# Altium PCB PCB_14layers_1mm73.PcbDoc (part 3 of 4)
Units mm, origin at the board's own origin, x right, y up, seen from the top; angles counter-clockwise.
Board outline 66 x 50 mm, 14 copper layers (Top Layer, Int1 (GND), Int2 (PWR), Int3 (Sign), GND, Int4 (Sign), Int5 (GND), Int6 (PWR), Int7 (Sign), GND2, Int8 (Sign), Int9 (PWR), Int10 (GND), Bottom Layer), stack 1.644 mm thick; 436 components, 541 nets, 2990 pads, 78 vias.
Unrouted connection lines stored in the file: 1647.
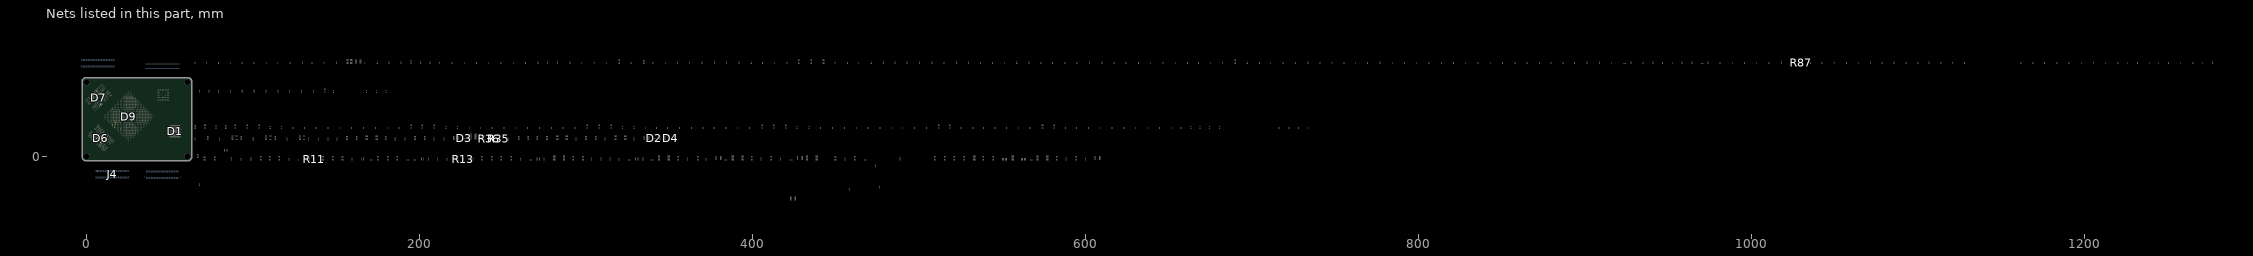
[diagram p14: the nets of this part, all layers, seen from the top]

## Part data (continued)
D5: "High Efficiency, 1MHz, 3A, 5.5V Input Synchronous Step Down Regulator", Manufacturer=Silergy, Package=SOT-23(6), Temperature=-40...+125°C, ComponentLink1Description=Link, ComponentLink2Description=LocalLink, ComponentLink2URL=C:\Users\Public\Documents\Altium\datasheet\ICs_PWR\SY8089AAC.pdf, PartNumber=SY8089AAC, Type="Step Down"
D6 D7: "LPDDR4 TFBGA-200", Manufacturer=Micron, Package=TFBGA-200, Temperature=-40...+105°C, ComponentLink1Description=Link, ComponentLink1URL=https://www.farnell.com/datasheets/3681594.pdf, ComponentLink2Description=LocalLink, ComponentLink2URL=C:\Users\Public\Documents\Altium\Datasheet\ICs\BIWINIndustrialLPDDR4X4266DatasheetV3.0_BWMZCX32H2A-64GI-X.pdf, PartNumber="MT53E2G32D4DE-046 AAT:A", Type=LPDDR4
D8: "eMMC", Manufacturer="Samsung Semiconductor", Package=153-FBGA, Temperature=-40...+125°C, ComponentLink1Description=Link, ComponentLink1URL=https://www.lcsc.com/datasheet/lcsc_datasheet_2410121848_Samsung-KLM8G1GETF-B041_C499918.pdf, ComponentLink2Description=LocalLink, ComponentLink2URL=C:\Users\Public\Documents\Altium\Datasheet\ICs\2410121848_Samsung-KLM8G1GETF-B041_C499918.pdf, PartNumber=KLM8G1GETF-B041, Type=eMMC
D9: "A high perfomance, low power AIoT processor", Manufacturer=Rockchip, Package=FCBGA1088L, Temperature=-40...+125°C, ComponentLink1Description="New link", ComponentLink1URL=C:\Users\Public\Documents\Altium\Datasheet\ICs\Rockchip_RK3588_Datasheet_V1.3-20220328.pdf, PartNumber=RK3588M, Type=Processor
D10: "Automotive Single-Pole Double-Throw Analog Switch", Manufacturer="Texas Instruments", Package="SOT-23 (6)", Temperature=-40...+125°C, ComponentLink1Description=Link, ComponentLink1URL=https://www.ti.com/lit/ds/symlink/sn74lvc1g3157-q1.pdf?ts=1743508565257&ref_url=https%253A%252F%252Fwww.ti.com%252Fproduct%252FSN74LVC1G3157-Q1, ComponentLink2Description=LocalLink, ComponentLink2URL=C:\Users\Public\Documents\Altium\Datasheet\ICs\sn74lvc1g3157-q1.pdf, PartNumber=1P1G3157QDBVRQ1, Type="Analog Switch"
D11: "300 mA, Low Voltage, Low Quiescent Current LDO Regulator", Manufacturer=Microchip, Package=SOT-23(5), Temperature=-40...+125°C, ComponentLink1Description=Link, ComponentLink1URL=https://ww1.microchip.com/downloads/aemDocuments/documents/APID/ProductDocuments/DataSheets/MCP1824-Data-Sheet-DS20002070.pdf, ComponentLink2Description=LocalLink, ComponentLink2URL=C:\Users\Public\Documents\Altium\Datasheet\ICs_PWR\MCP1824-Data-Sheet-DS20002070.pdf, PartNumber=MCP1824T-3302E/OT, Type=LDO
D12: "Low-Noise, Fixed Output Voltage 3.3V, 500mA LDO Regulator", Manufacturer="Shanghai Belling", Package=SOT-23(5), Temperature=-40...+125°C, ComponentLink1Description=Link, ComponentLink1URL=https://jlcpcb.com/api/file/downloadByFileSystemAccessId/8588911280069074944, ComponentLink2Description=LocalLink, ComponentLink2URL=C:\Users\Public\Documents\Altium\datasheet\ICs_PWR\C313520.pdf, PartNumber=BL8555-33PRA, Type=LDO
D13: "Low-Noise, Fixed Output Voltage 1.8V, 500mA LDO Regulator", Manufacturer=RichTech, Package=SOT-23(5), Temperature=-40...+125°C, ComponentLink1Description=Link, ComponentLink1URL=https://www.richtek.com/assets/product_file/RT9167=RT9167A/DS9167A-29.pdf, ComponentLink2Description=LocalLink, ComponentLink2URL=C:\Users\Public\Documents\Altium\datasheet\ICs_PWR\DS9167A-29.pdf, PartNumber=RT9167A-18CB, Type=LDO
J1 J2 J3 J4: "0.5mm Pitch SMT Board-to-Board Connector", Manufacturer=Hirose, Temperature=-40...+105°C, ComponentLink1Description=Link, ComponentLink2Description=LocalLink, Male/Female=F, Row=2, Type=Board-to-Board
  J1 J3 J4: ComponentLink2URL=C:\Users\Public\Documents\Altium\Datasheet\Connectors\DF12NA(3.0)-80DS-0.5V(51).pdf, PartNumber=DF12NA(3.0)-80DS-0.5V(51), Positions=80
  J2: ComponentLink1URL=https://www.hirose.com/ru/product/document?clcode=CL0684-4032-1-51&productname=DF40C-100DP-0.4V(51)&series=DF40&documenttype=2DDrawing&lang=ru&documentid=0001001212, ComponentLink2URL=C:\Users\Public\Documents\Altium\Datasheet\Connectors\DF40C-100DP-0.4V(51)_CL0684-4032-1-51_2DDrawing_0001001212.pdf, PartNumber=DF40C-100DP-0.4V(51), Positions=100
L1 L6 L7 L8 L11 L12 L14: "Power Inductor, 220nH, ±20%, 12A, SMD 3225, -40...+125°C", Manufacturer=INPAQ, MaxCurrent=12A, Package="SMD 3225", Temperature=-40...+125°C, Tolerance=±20%, ComponentLink1Description=Link, ComponentLink1URL=https://product.tdk.com/system/files/dam/doc/product/inductor/inductor/smd/catalog/inductor_commercial_power_tms322512alm_en.pdf, ComponentLink2Description=LocalLink, ComponentLink2URL=C:\Users\Public\Documents\Altium\Datasheet\Inductance\inductor_commercial_power_tms322512alm_en.pdf, DCR=0.006R, PartNumber=TMS322512ALM-R22MTAA, Type="Power Inductor"
L2 L3 L4 L5 L9 L10: "Power Inductor, 0.47uH, ±20%, 5.6A, SMD 2016, -40...+125°C", Manufacturer=INPAQ, MaxCurrent=5.6A, Package="SMD 2016", Temperature=-40...+125°C, Tolerance=±20%, ComponentLink1Description=Link, ComponentLink1URL=https://www.inpaqgp.com/product-co1.php?k=hZx4bT6%2FQ%2BNwEKUtRT9BJg%3D%3D#, ComponentLink2Description=LocalLink, ComponentLink2URL=C:\Users\Public\Documents\Altium\Datasheet\Inductance\spec_WIP201610.pdf, DCR=0.033R, PartNumber=WIP201610P-R47ML, Type="Power Inductor"
L15: "Power Inductor, 2.2uH, ±20%, 2.1A, SMD 4026, -40...+125°C", Manufacturer=Sunlord, MaxCurrent=2.1A, Package="SMD 4026", Temperature=-40...+125°C, Tolerance=±20%, ComponentLink1Description=Link, ComponentLink2Description=LocalLink, ComponentLink2URL=C:\Users\Public\Documents\Altium\Datasheet\Inductance\swpa.pdf, DCR=0.04R, PartNumber=SWPA4026S2R2MT, Type="Power Inductor"
R1 R2 R9 R10 R11 R13 R14 R15 R16 R18 R22 R23 R24: "Resistor film, 100R, ±5%, 0402, 0.0625W, -55...+155°C", Manufacturer=Yageo, Package=0402, Power=0.0625W, Temperature=-55...+155°C, Tolerance=±5%, ComponentLink1Description=Link, ComponentLink1URL=https://www.yageo.com/upload/media/product/productsearch/datasheet/rchip/PYu-RC_Group_51_RoHS_L_12.pdf, ComponentLink2Description=LocalLink, ComponentLink2URL=C:\Users\Public\Documents\Altium\Datasheet\Resistors\PYu-RC_Group_51_RoHS_L_12.pdf, PartNumber=RC0402JR-07100RL, Type="Resistor film"
R12 R79 R94 R95 R96 R97: "NC, No BOM", Package=0402, PartNumber=NC, Type="Resistor film"
R17 R46: "Resistor film, 120K, ±1%, 0402, 0.0625W, -55...+155°C", Manufacturer=Yageo, Package=0402, Power=0.0625W, Temperature=-55...+155°C, Tolerance=±1%, ComponentLink1Description=Link, ComponentLink1URL=https://www.yageo.com/upload/media/product/productsearch/datasheet/rchip/PYu-RC_Group_51_RoHS_L_12.pdf, ComponentLink2Description=LocalLink, ComponentLink2URL=C:\Users\Public\Documents\Altium\Datasheet\Resistors\PYu-RC_Group_51_RoHS_L_12.pdf, PartNumber=RC0402FR-07120KL, Type="Resistor film"
R19 R72: "Resistor film, 0R, 0402, -55...+155°C", Manufacturer=Yageo, Package=0402, Temperature=-55...+155°C, ComponentLink1Description=Link, ComponentLink1URL=https://www.yageo.com/upload/media/product/productsearch/datasheet/rchip/PYu-RC_Group_51_RoHS_L_12.pdf, ComponentLink2Description=LocalLink, ComponentLink2URL=C:\Users\Public\Documents\Altium\Datasheet\Resistors\PYu-RC_Group_51_RoHS_L_12.pdf, PartNumber=RC0402JR-070RL, Type="Resistor film"
R20: "Resistor film, 20K, ±1%, 0402, 0.0625W, -55...+155°C", Manufacturer=Yageo, Package=0402, Power=0.0625W, Temperature=-55...+155°C, Tolerance=±1%, ComponentLink1Description=Link, ComponentLink1URL=https://www.yageo.com/upload/media/product/productsearch/datasheet/rchip/PYu-RC_Group_51_RoHS_L_12.pdf, ComponentLink2Description=LocalLink, ComponentLink2URL=C:\Users\Public\Documents\Altium\Datasheet\Resistors\PYu-RC_Group_51_RoHS_L_12.pdf, PartNumber=RC0402FR-0720KL, Type="Resistor film"
R35 R37 R38 R42 R78 R85 R93: "Resistor film, 100K, ±5%, 0402, 0.0625W, -55...+155°C", Manufacturer=Yageo, Package=0402, Power=0.0625W, Temperature=-55...+155°C, Tolerance=±5%, ComponentLink1Description=Link, ComponentLink1URL=https://www.yageo.com/upload/media/product/productsearch/datasheet/rchip/PYu-RC_Group_51_RoHS_L_12.pdf, ComponentLink2Description=LocalLink, ComponentLink2URL=C:\Users\Public\Documents\Altium\Datasheet\Resistors\PYu-RC_Group_51_RoHS_L_12.pdf, PartNumber=RC0402JR-07100KL, Type="Resistor film"
R36 R80 R86: "Resistor film, 120K, ±5%, 0402, 0.0625W, -55...+155°C", Manufacturer=Yageo, Package=0402, Power=0.0625W, Temperature=-55...+155°C, Tolerance=±5%, ComponentLink1Description=Link, ComponentLink1URL=https://www.yageo.com/upload/media/product/productsearch/datasheet/rchip/PYu-RC_Group_51_RoHS_L_12.pdf, ComponentLink2Description=LocalLink, ComponentLink2URL=C:\Users\Public\Documents\Altium\Datasheet\Resistors\PYu-RC_Group_51_RoHS_L_12.pdf, PartNumber=RC0402JR-07120KL, Type="Resistor film"
R41 R50 R51 R58 R59 R68 R69 R70: "Resistor film, 10K, ±5%, 0402, 0.0625W, -55...+155°C", Manufacturer=Yageo, Package=0402, Power=0.0625W, Temperature=-55...+155°C, Tolerance=±5%, ComponentLink1Description=Link, ComponentLink1URL=https://www.yageo.com/upload/media/product/productsearch/datasheet/rchip/PYu-RC_Group_51_RoHS_L_12.pdf, ComponentLink2Description=LocalLink, ComponentLink2URL=C:\Users\Public\Documents\Altium\Datasheet\Resistors\PYu-RC_Group_51_RoHS_L_12.pdf, PartNumber=RC0402JR-0710KL, Type="Resistor film"
R45: "Resistor film, 100K, ±1%, 0402, 0.0625W, -55...+155°C", Manufacturer=Yageo, Package=0402, Power=0.0625W, Temperature=-55...+155°C, Tolerance=±1%, ComponentLink1Description=Link, ComponentLink1URL=https://www.yageo.com/upload/media/product/productsearch/datasheet/rchip/PYu-RC_Group_51_RoHS_L_12.pdf, ComponentLink2Description=LocalLink, ComponentLink2URL=C:\Users\Public\Documents\Altium\Datasheet\Resistors\PYu-RC_Group_51_RoHS_L_12.pdf, PartNumber=RC0402FR-07100KL, Type="Resistor film"
R49 R57 R73 R76 R81 R82: "Resistor film, 240R, ±1%, 0201, 0.05W, -55...+125°C", Manufacturer=Yageo, Package=0201, Power=0.05W, Temperature=-55...+125°C, Tolerance=±1%, ComponentLink1Description=Link, ComponentLink1URL=https://www.yageo.com/upload/media/product/productsearch/datasheet/rchip/PYu-RC_Group_51_RoHS_L_12.pdf, ComponentLink2Description=LocalLink, ComponentLink2URL=C:\Users\Public\Documents\Altium\Datasheet\Resistors\PYu-RC_Group_51_RoHS_L_12.pdf, PartNumber=RC0201FR-07240RL, Type="Resistor film"
R53 R55 R61 R63: "Resistor film, 49R9, ±1%, 0201, 0.05W, -55...+125°C", Manufacturer=Yageo, Package=0201, Power=0.05W, Temperature=-55...+125°C, Tolerance=±1%, ComponentLink1Description=Link, ComponentLink1URL=https://www.yageo.com/upload/media/product/productsearch/datasheet/rchip/PYu-RC_Group_51_RoHS_L_12.pdf, ComponentLink2Description=LocalLink, ComponentLink2URL=C:\Users\Public\Documents\Altium\Datasheet\Resistors\PYu-RC_Group_51_RoHS_L_12.pdf, PartNumber=RC0201FR-0749R9L, Type="Resistor film"
R65 R67 R88 R89: "Resistor film, 0R, 0603, 0.1W, -55...+155°C", Manufacturer=Yageo, Package=0603, Power=0.1W, Temperature=-55...+155°C, Tolerance=±1%, ComponentLink1Description=Link, ComponentLink1URL=https://www.yageo.com/upload/media/product/productsearch/datasheet/rchip/PYu-RC_Group_51_RoHS_L_12.pdf, ComponentLink2Description=LocalLink, ComponentLink2URL=C:\Users\Public\Documents\Altium\Datasheet\Resistors\PYu-RC_Group_51_RoHS_L_12.pdf, PartNumber=RC0603JR-070RL, Type="Resistor film"
R66: "NC, No BOM", Package=0603, PartNumber=NC, Type="Resistor film"
R71: "Resistor film, 47K, ±1%, 0603, 0.1W, -55...+155°C", Manufacturer=Yageo, Package=0603, Power=0.1W, Temperature=-55...+155°C, Tolerance=±1%, ComponentLink1Description=Link, ComponentLink1URL=https://www.yageo.com/upload/media/product/productsearch/datasheet/rchip/PYu-RC_Group_51_RoHS_L_12.pdf, ComponentLink2Description=LocalLink, ComponentLink2URL=C:\Users\Public\Documents\Altium\Datasheet\Resistors\PYu-RC_Group_51_RoHS_L_12.pdf, PartNumber=RC0603FR-0747KL, Type="Resistor film"
R74 R77 R87 R91: "Resistor film, 22R, ±5%, 0402, 0.0625W, -55...+155°C", Manufacturer=Yageo, Package=0402, Power=0.0625W, Temperature=-55...+155°C, Tolerance=±5%, ComponentLink1Description=Link, ComponentLink1URL=https://www.yageo.com/upload/media/product/productsearch/datasheet/rchip/PYu-RC_Group_51_RoHS_L_12.pdf, ComponentLink2Description=LocalLink, ComponentLink2URL=C:\Users\Public\Documents\Altium\Datasheet\Resistors\PYu-RC_Group_51_RoHS_L_12.pdf, PartNumber=RC0402JR-0722RL, Type="Resistor film"
R75: "Resistor film, 510K, ±5%, 0402, 0.0625W, -55...+155°C", Manufacturer=Yageo, Package=0402, Power=0.0625W, Temperature=-55...+155°C, Tolerance=±5%, ComponentLink1Description=Link, ComponentLink1URL=https://www.yageo.com/upload/media/product/productsearch/datasheet/rchip/PYu-RC_Group_51_RoHS_L_12.pdf, ComponentLink2Description=LocalLink, ComponentLink2URL=C:\Users\Public\Documents\Altium\Datasheet\Resistors\PYu-RC_Group_51_RoHS_L_12.pdf, PartNumber=RC0402JR-07510KL, Type="Resistor film"
R83 R84: "Resistor film, 2K2, ±5%, 0201, 0.05W, -55...+125°C", Manufacturer=Yageo, Package=0201, Power=0.05W, Temperature=-55...+125°C, Tolerance=±5%, ComponentLink1Description=Link, ComponentLink1URL=https://www.yageo.com/upload/media/product/productsearch/datasheet/rchip/PYu-RC_Group_51_RoHS_L_12.pdf, ComponentLink2Description=LocalLink, ComponentLink2URL=C:\Users\Public\Documents\Altium\Datasheet\Resistors\PYu-RC_Group_51_RoHS_L_12.pdf, PartNumber=RC0201JR-072K2L, Type="Resistor film"
R90 R92: "Resistor film, 0R, 0201, 0.05W, -55...+155°C", Manufacturer=Yageo, Package=0201, Power=0.05W, Temperature=-55...+155°C, Tolerance=±5%, ComponentLink1Description=Link, ComponentLink1URL=https://www.yageo.com/upload/media/product/productsearch/datasheet/rchip/PYu-RC_Group_51_RoHS_L_12.pdf, ComponentLink2Description=LocalLink, ComponentLink2URL=C:\Users\Public\Documents\Altium\Datasheet\Resistors\PYu-RC_Group_51_RoHS_L_12.pdf, PartNumber=RC0201JR-070RL, Type="Resistor film"
VD1: "ESD per IEC 61000-4-2", Manufacturer=MSKSEMI, Package=DFN1006-2L, Temperature=-65...+150°C, ComponentLink1Description=Link, ComponentLink1URL=https://www.lcsc.com/datasheet/lcsc_datasheet_2306211604_MSKSEMI-AZ5825-01F-MS_C7379989.pdf, ComponentLink2Description=LocalLink, ComponentLink2URL=C:\Users\Public\Documents\Altium\Datasheet\Diodes\2306211604_MSKSEMI-AZ5825-01F-MS_C7379989.pdf, PartNumber=AZ5825-01F-MS, Type=ESD
ZQ1: "Surface Mount Crystal Oscillator, 24MHz", Manufacturer=Hosonic, Package="3.2 x 2.5 x 0.7mm ceramic package", Temperature=-40...+85°C, ComponentLink1Description=Link, ComponentLink1URL=https://hosonic.com/Upload/202409/product_2024092818084106.pdf, ComponentLink2Description=LocalLink, ComponentLink2URL=C:\Users\Public\Documents\Altium\Datasheet\ICs\product_2024092818084106.pdf, PartNumber=E3SB24.0000F08E11, Type="Crystal Oscillators"

## Free pads (board coordinates)
  round 3.325 hole 3.3 copper offset 0.173,0.175: 0(0,0)
  round 3.325 hole 3.3 copper offset 0.175,-0.173: 0(0,44.5)
  round 3.325 hole 3.3 copper offset -0.175,0.173: 0(60.5,0)
  round 3.325 hole 3.3 copper offset -0.173,-0.175: 0(60.5,44.5)

## Via types
v1: diameter 0.6, hole 0.3, Top Layer to Bottom Layer, tented both sides, 48 vias
v2: diameter 0.45, hole 0.2, Top Layer to Bottom Layer, 30 vias

## Nets (pads, with @x,y where several pads share a name; then routed paths per layer and width w, separated by ;. In a path a pad name is that pad's centre, name@x,y a point inside that pad or via, vN(x,y) a via of type N, cw(c..) or ccw(c..) an arc to the next point about the centre after c; other vN are vias at no path point)
5V_PMIC_SYS: J4.5 R13.2
BIG/NPU_EN: D2.A2 D3.A2 D4.A2 R35.2 R36.2
CDR_CH0_A4_C: D7.H11
CLK_RK806-1: D1.17
CS_RK806-1: D1.18 R11.2 R87.2
DDR_CH0_A0_A: D6.H2 D9.T7
DDR_CH0_A0_B: D6.R2 D9.M8
DDR_CH0_A0_C: D7.H2
DDR_CH0_A0_D: D7.R2
DDR_CH0_A1_A: D6.J2 D9.T8
DDR_CH0_A1_B: D6.P2 D9.M5
DDR_CH0_A1_C: D7.J2
DDR_CH0_A1_D: D7.P2
DDR_CH0_A2_A: D6.H9 D9.P4
DDR_CH0_A2_B: D6.R9 D9.N5
DDR_CH0_A2_C: D7.H9
DDR_CH0_A2_D: D7.R9
DDR_CH0_A3_A: D6.H10 D9.P5
DDR_CH0_A3_B: D6.R10 D9.N4
DDR_CH0_A3_C: D7.H10
DDR_CH0_A3_D: D7.R10
DDR_CH0_A4_A: D6.H11 D9.R1
DDR_CH0_A4_B: D6.R11 D9.K1
DDR_CH0_A4_D: D7.R11
DDR_CH0_A5_A: D6.J11 D9.P2
DDR_CH0_A5_B: D6.P11 D9.L2
DDR_CH0_A5_C: D7.J11
DDR_CH0_A5_D: D7.P11
DDR_CH0_CLKA_N: D6.J9 D9.N1
DDR_CH0_CLKA_P: D6.J8 D9.N2
DDR_CH0_CLKB_N: D6.P9 D9.M1
DDR_CH0_CLKB_P: D6.P8 D9.M2
DDR_CH0_CLKC_N: D7.J9 D9.A12
DDR_CH0_CLKC_P: D7.J8 D9.B12
DDR_CH0_CLKD_N: D7.P9
DDR_CH0_CLKD_P: D7.P8
DDR_CH0_DM0_A: D6.C3 D9.Y4

## Text inside footprints (layer, text, board x,y; h text height)
D6: Top Overlay "12" at 11.791,2.017 h0.75 r225; Top Overlay "1" at 17.801,8.169 h0.75 r225; Top Overlay "AB" at 8.821,21.392 h0.75 r225; Top Overlay "A" at 17.872,11.209 h0.75 r225
D7: Top Overlay "12" at -1.772,31.921 h0.75 r135; Top Overlay "1" at 4.379,25.91 h0.75 r135; Top Overlay "AB" at 17.602,34.89 h0.75 r135; Top Overlay "A" at 7.42,25.839 h0.75 r135